# Altium PCB DIO_8SMA_8MCX.PcbDoc (part 4 of 9)
Units mm, origin at the board's own origin, x right, y up, seen from the top; angles counter-clockwise.
Board outline 222.9 x 100 mm, 6 copper layers (TopLayer, L2, L3, L4, L5, Bottom Layer), stack 1.492 mm thick; 542 components, 326 nets, 1968 pads, 1583 vias.
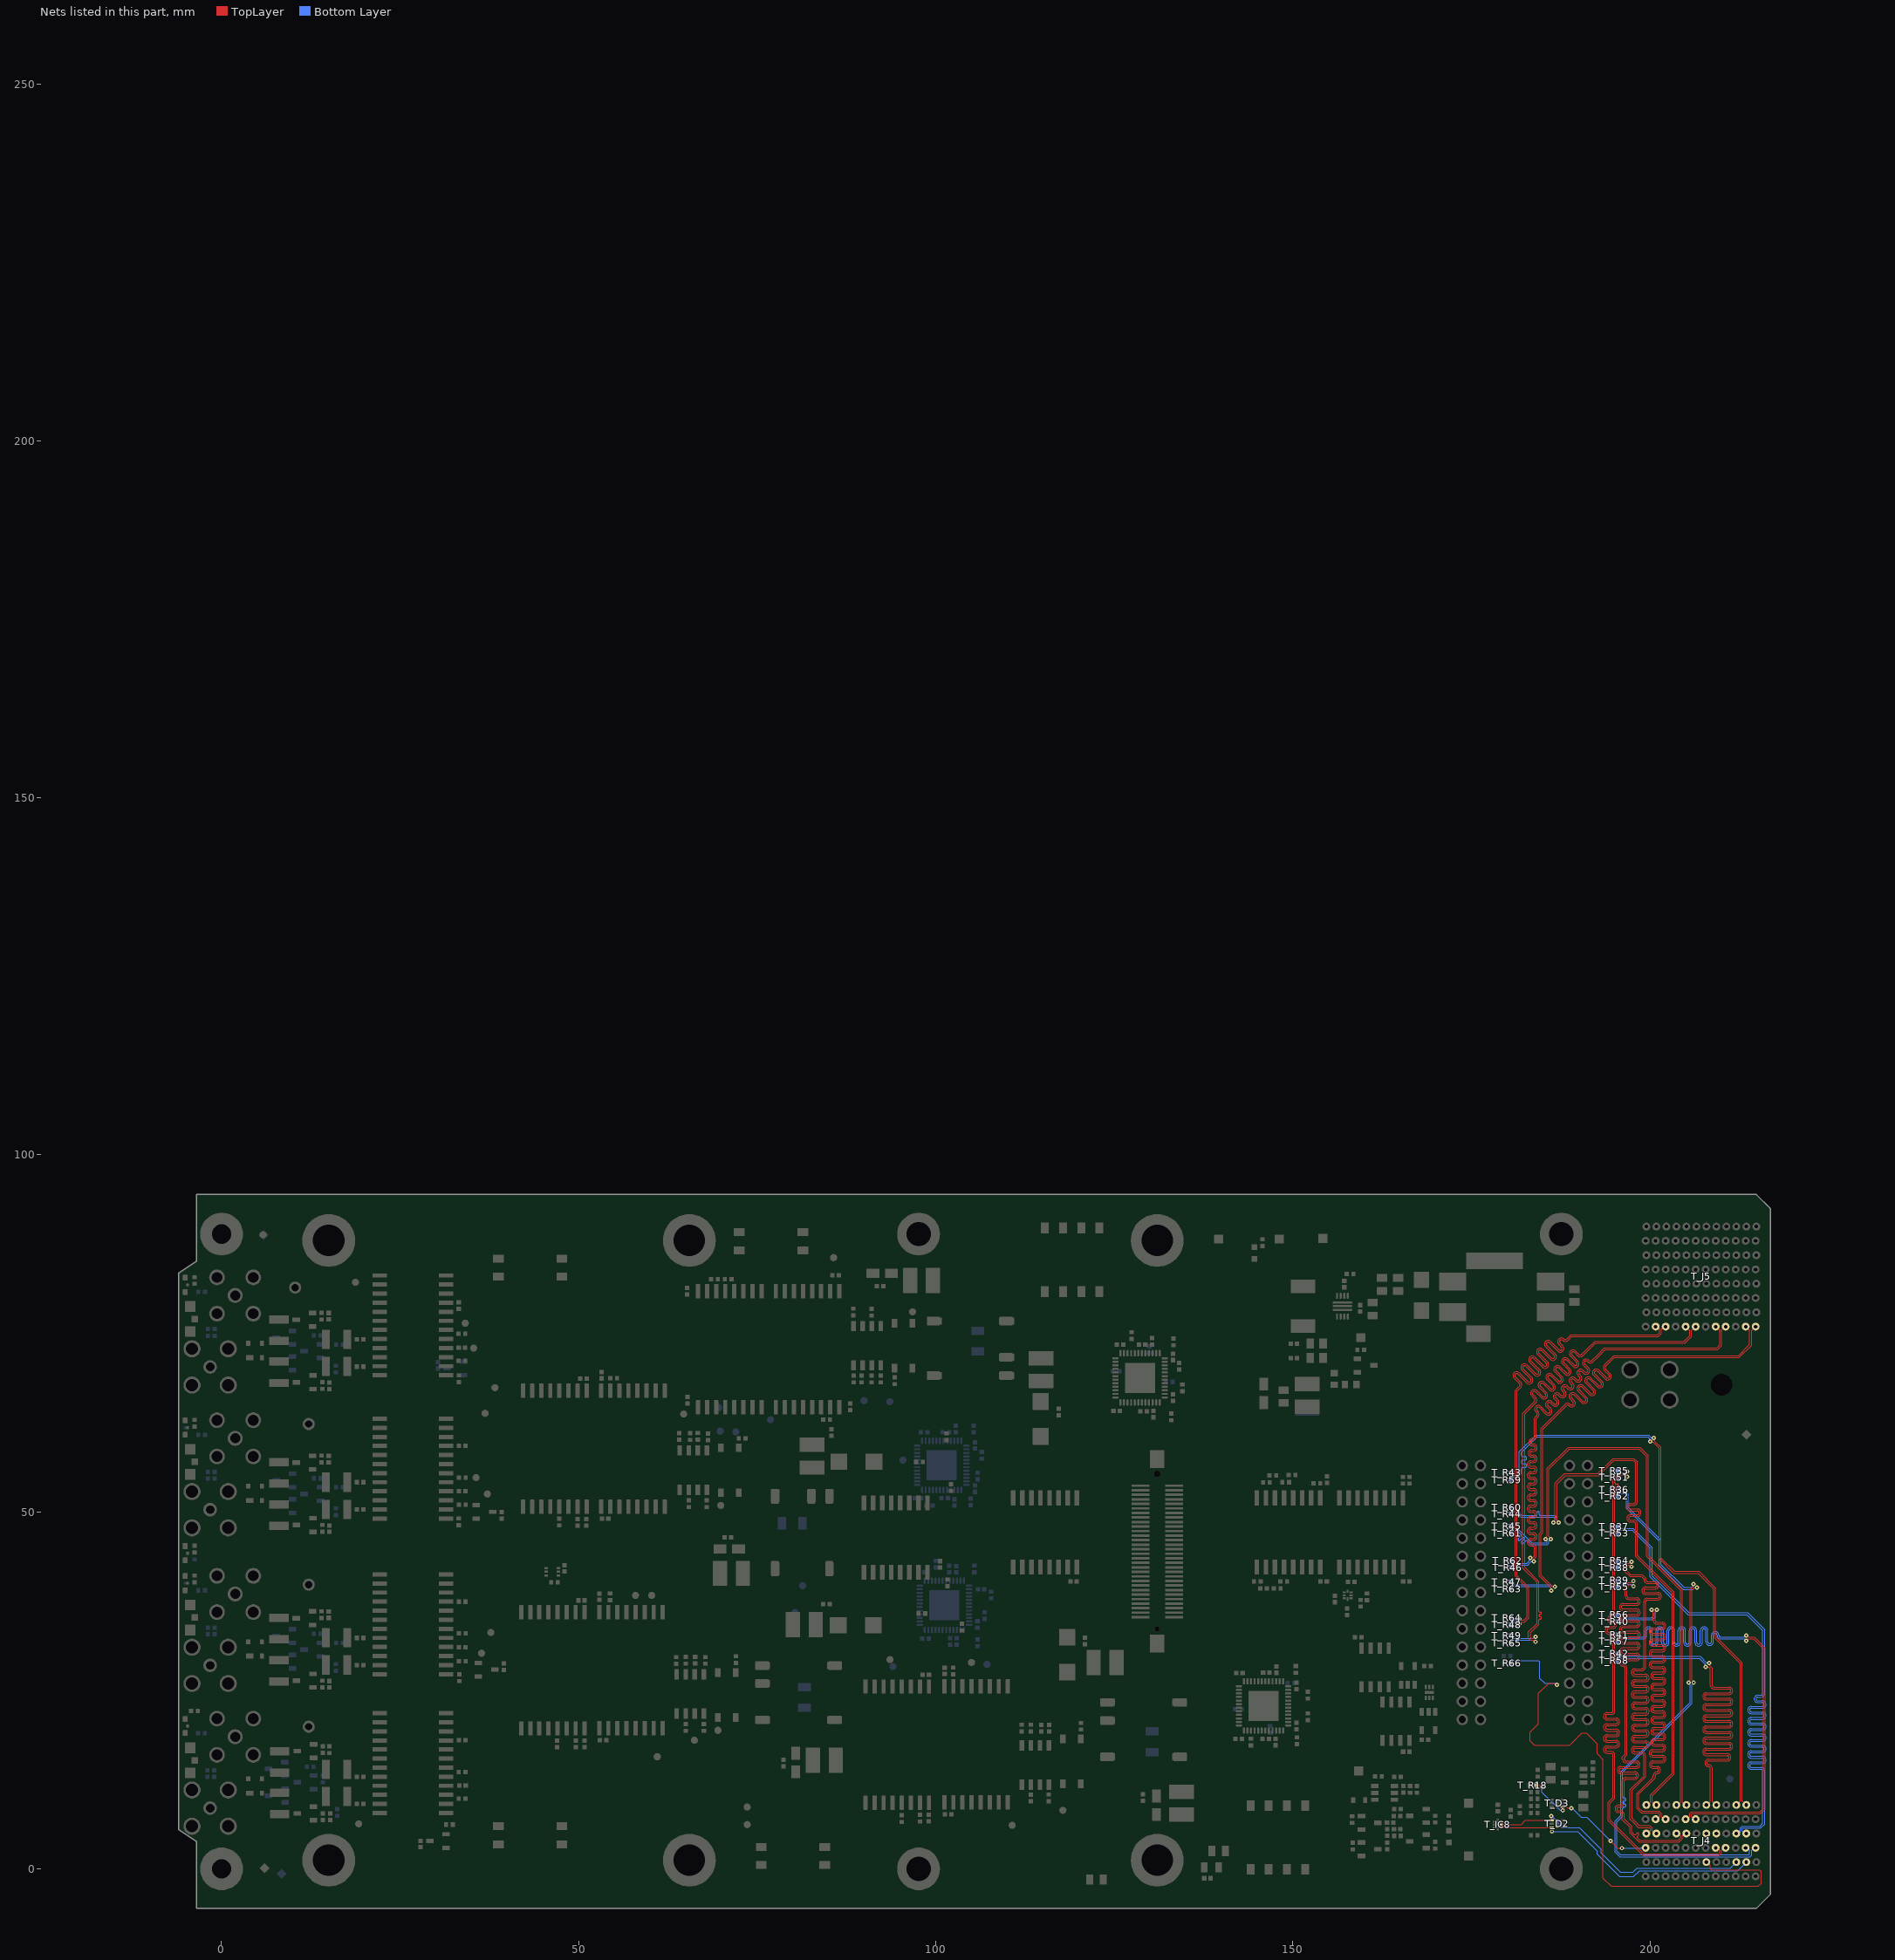
[diagram p7: the nets of this part, all layers, seen from the top]

## Via types
v1: diameter 0.6, hole 0.25, TopLayer to Bottom Layer, tented both sides, 1359 vias
v2: diameter 0.5, hole 0.2, TopLayer to Bottom Layer, tented both sides, 127 vias
v3: diameter 0.6, hole 0.3, TopLayer to Bottom Layer, tented both sides, 45 vias
v4: diameter 0.8, hole 0.3, TopLayer to Bottom Layer, tented both sides, 40 vias
v5: diameter 0.5, hole 0.25, TopLayer to Bottom Layer, tented both sides, 12 vias

## Nets (pads, with @x,y where several pads share a name; then routed paths per layer and width w, separated by ;. In a path a pad name is that pad's centre, name@x,y a point inside that pad or via, vN(x,y) a via of type N, cw(c..) or ccw(c..) an arc to the next point about the centre after c; other vN are vias at no path point) (continued)
BGA3: T_D3.4 T_J4.L3 T_R18.2 | length 20.2
  TopLayer w0.12: T_R18.2@184.07,11.7 184.6,11.7 v1(184.9,11.4) ; T_D3.4@187.76,8.7 T_D3.4@187.763,8.697 ; v1(187.8,8.2) 187.8,8.66 T_D3.4@187.763,8.697 ; v1(189,8.5) 188.452,8.5 188.255,8.697 T_D3.4@187.763,8.697 ; v1(194.475,3.919) 195.49,2.904 v1@196.096,2.904 ; v1@196.081,2.919 v1@196.096,2.904 ; v1(196.1,2.9) v1@196.096,2.904
  Bottom Layer w0.12: v1(184.9,11.4) 184.9,10.721 187.421,8.2 v1(187.8,8.2) ; v1(189,8.5) 189.1,8.5 190.344,7.256 191.138,7.256 v1(194.475,3.919) ; v1(196.1,2.9) 199.353,2.9 T_J4.L3@199.403,2.95
BP_CLK.CLK_N: T_J4.F4
BP_CLK.CLK_P: T_J4.E4
BP_I2C.SCL: T_D2.3 T_IC8.6 T_J4.B2 | length 38.6
  TopLayer w0.15: T_IC8.6@179.175,5.8 182.826,5.8 T_D2.3@186.24,5.8 186.278,5.762 v1(186.278,5.226)
  Bottom Layer w0.15: v1(186.278,5.226) 186.754,5.206 186.878,5.206 189.894,5.206 192.6,2.5 192.6,2.065 195.744,-1.08 197.72,-1.08 198.529,-0.271 212.282,-0.271 T_J4.B2@213.503,0.95
BP_I2C.SDA: T_D2.1 T_IC8.7 T_J4.C2 | length 37.9
  TopLayer w0.15: T_IC8.7@179.175,6.2 181.97,6.2 182.57,6.8 T_D2.1@186.24,6.8 186.24,7.36 v1(186.2,7.4)
  Bottom Layer w0.15: v1(186.2,7.4) 187.8,5.8 190.1,5.8 193.2,2.7 193.2,2.208 195.847,-0.439 197.661,-0.439 198.18,0.08 211.234,0.08 T_J4.C2@212.103,0.95
BP_IO.LVDS_N0: T_J4.E3 T_R51.1 | length 86.3
  TopLayer w0.116: v1(196.8,54.915) 196.72,54.915 196.49,55.144 195.844,55.144 195.529,54.829 195.097,54.397 195.097,54.061 ccw(c195.255,54.061) 195.255,53.903 195.428,53.903 cw(c195.428,53.745) 195.586,53.745 cw(c195.428,53.745) 195.428,53.587 195.255,53.587 ccw(c195.255,53.429) 195.097,53.429 ccw(c195.255,53.429) 195.255,53.271 195.428,53.271 cw(c195.428,53.113) 195.586,53.113 cw(c195.428,53.113) 195.428,52.955 195.255,52.955 ccw(c195.255,52.797) 195.097,52.797 195.097,52.423 195.097,36.402 195.097,35.739 cw(c194.578,35.739) 194.578,35.22 ccw(c194.578,34.962) 194.578,34.704 194.809,34.704 cw(c194.809,34.185) 194.809,33.666 194.251,33.666 ccw(c194.251,33.408) 194.251,33.15 194.578,33.15 cw(c194.578,32.631) 195.097,32.631 195.097,32.442 195.097,22.968 195.097,22.143 cw(c194.578,22.143) 194.578,21.624 194.016,21.624 ccw(c194.016,21.366) 194.016,21.108 195.239,21.108 cw(c195.239,20.589) 195.239,20.07 194.016,20.07 ccw(c194.016,19.812) 194.016,19.554 195.239,19.554 cw(c195.239,19.035) 195.239,18.516 194.016,18.516 ccw(c194.016,18.259) 194.016,18.001 195.239,18.001 cw(c195.239,17.482) 195.239,16.963 194.016,16.963 ccw(c194.016,16.705) 194.016,16.447 194.578,16.447 cw(c194.578,15.928) 195.097,15.928 195.097,15.739 195.097,9.862 194.412,9.176 194.412,6.848 194.821,6.439 195.131,6.128 199.16,2.1 209.57,2.1 209.77,2.3 209.77,2.387 209.769,2.592 209.411,2.95 T_J4.E3@209.2,2.95
  Bottom Layer w0.116: T_R51.1@195.47,54.8 195.702,55.032 195.702,55.077 195.77,55.144 196.17,55.144 196.49,55.144 196.72,54.915 v1(196.8,54.915)
BP_IO.LVDS_N1: T_J4.B3 T_R52.1 | length 83.1
  TopLayer w0.116: v1(206.129,26.1) 206.129,26.18 205.9,26.41 205.9,39.025 206.219,39.343 206.543,39.343 v1(206.6,39.4)
  Bottom Layer w0.116: T_R52.1@195.47,52.2 195.702,52.432 195.702,52.463 195.77,52.531 196.487,52.531 196.7,52.318 196.7,50.5 201.3,45.9 201.3,42.492 204.653,39.139 206.014,39.139 206.219,39.343 206.543,39.343 v1(206.6,39.4) ; v1(206.129,26.1) 206.129,26.02 205.9,25.79 205.9,23.2 196.2,13.5 196.2,10.702 196.2,10.109 ccw(c196.408,10.109) 196.408,9.901 196.437,9.901 cw(c196.437,9.693) 196.645,9.693 cw(c196.437,9.693) 196.437,9.485 196.408,9.485 ccw(c196.408,9.277) 196.2,9.277 ccw(c196.408,9.277) 196.408,9.069 196.437,9.069 cw(c196.437,8.861) 196.645,8.861 cw(c196.437,8.861) 196.437,8.653 196.408,8.653 ccw(c196.408,8.445) 196.2,8.445 196.2,7.971 196.2,7.355 195.4,6.555 195.4,2.453 195.891,1.962 213.902,1.962 213.97,2.03 213.97,2.387 213.969,2.592 213.611,2.95 T_J4.B3@213.4,2.95
BP_IO.LVDS_N2: T_J4.C4 T_R53.1 | length 85.6
  Bottom Layer w0.116: T_R53.1@195.47,47 195.692,47.222 195.692,47.392 195.7,47.4 197.539,47.4 200.039,44.9 200.039,40.892 205.331,35.6 213.6,35.6 215.8,33.4 215.8,25.267 215.8,24.572 cw(c215.542,24.572) 215.542,24.314 215.099,24.314 ccw(c215.099,23.795) 215.099,23.276 215.734,23.276 cw(c215.734,23.018) 215.734,22.76 214.22,22.76 ccw(c214.22,22.241) 214.22,21.722 215.734,21.722 cw(c215.734,21.464) 215.734,21.206 214.22,21.206 ccw(c214.22,20.687) 214.22,20.168 215.734,20.168 cw(c215.734,19.91) 215.734,19.652 214.22,19.652 ccw(c214.22,19.133) 214.22,18.614 215.734,18.614 cw(c215.734,18.356) 215.734,18.098 214.22,18.098 ccw(c214.22,17.579) 214.22,17.06 215.734,17.06 cw(c215.734,16.802) 215.734,16.544 214.22,16.544 ccw(c214.22,16.025) 214.22,15.506 215.734,15.506 cw(c215.734,15.248) 215.734,14.99 214.22,14.99 ccw(c214.22,14.471) 214.22,13.952 215.542,13.952 cw(c215.542,13.694) 215.8,13.694 215.8,13.505 215.8,6.369 215.392,5.961 212.89,5.961 212.67,5.74 212.67,5.512 212.669,5.308 212.311,4.95 T_J4.C4@212.1,4.95
BP_IO.LVDS_N3: T_J4.L4 T_R54.1 | length 82.7
  TopLayer w0.116: v1(197.432,43.022) 197.351,43.022 197.122,42.793 196.86,42.793 196.439,42.372 196.439,41.692 197.187,40.944 198.795,40.944 199.041,40.698 199.139,40.6 199.139,40.509 ccw(c199.658,40.509) 199.658,39.99 200.738,39.99 cw(c200.738,39.732) 200.996,39.732 cw(c200.738,39.732) 200.738,39.474 199.397,39.474 ccw(c199.397,38.955) 198.878,38.955 ccw(c199.397,38.955) 199.397,38.436 201.103,38.436 cw(c201.103,38.178) 201.361,38.178 cw(c201.103,38.178) 201.103,37.92 199.658,37.92 ccw(c199.658,37.401) 199.139,37.401 199.139,36.562 199.139,36.319 199.139,28.908 199.139,28.289 cw(c198.881,28.289) 198.881,28.031 197.919,28.031 ccw(c197.919,27.512) 197.919,26.993 199.364,26.993 cw(c199.364,26.735) 199.364,26.477 197.919,26.477 ccw(c197.919,25.958) 197.919,25.439 199.364,25.439 cw(c199.364,25.181) 199.364,24.923 197.919,24.923 ccw(c197.919,24.404) 197.919,23.885 199.364,23.885 cw(c199.364,23.627) 199.364,23.369 197.919,23.369 ccw(c197.919,22.85) 197.919,22.331 199.364,22.331 cw(c199.364,22.073) 199.364,21.815 197.919,21.815 ccw(c197.919,21.296) 197.919,20.777 199.364,20.777 cw(c199.364,20.519) 199.364,20.261 197.919,20.261 ccw(c197.919,19.742) 197.919,19.223 199.364,19.223 cw(c199.364,18.965) 199.364,18.707 197.919,18.707 ccw(c197.919,18.188) 197.919,17.669 199.364,17.669 cw(c199.364,17.411) 199.364,17.153 197.919,17.153 ccw(c197.919,16.634) 197.919,16.115 198.881,16.115 cw(c198.881,15.857) 199.139,15.857 199.139,15.669 199.139,13.008 197.239,11.108 197.239,6.96 197.61,6.588 197.61,6.581 198.392,5.8 199.869,5.8 200.07,5.6 200.07,5.512 200.069,5.308 199.711,4.95 T_J4.L4@199.5,4.95
  Bottom Layer w0.116: T_R54.1@195.47,43.125 195.702,42.893 195.702,42.861 195.77,42.793 197.122,42.793 197.351,43.022 v1(197.432,43.022)
BP_IO.LVDS_N4: T_J4.I4 T_R55.1 | length 85.3
  TopLayer w0.116: v1(197.7,39.6) 197.569,39.6 197.35,39.819 197.1,39.819 196.8,39.519 196.8,38.408 196.8,38.22 ccw(c197.058,38.22) 197.058,37.962 198.133,37.962 cw(c198.133,37.443) 198.133,36.924 196.26,36.924 ccw(c196.26,36.666) 196.26,36.408 198.133,36.408 cw(c198.133,35.889) 198.133,35.37 196.26,35.37 ccw(c196.26,35.112) 196.26,34.854 198.133,34.854 cw(c198.133,34.335) 198.133,33.816 196.26,33.816 ccw(c196.26,33.558) 196.26,33.3 198.133,33.3 cw(c198.133,32.781) 198.133,32.262 196.26,32.262 ccw(c196.26,32.004) 196.26,31.746 198.133,31.746 cw(c198.133,31.227) 198.133,30.708 196.26,30.708 ccw(c196.26,30.45) 196.26,30.192 198.133,30.192 cw(c198.133,29.673) 198.133,29.154 196.26,29.154 ccw(c196.26,28.896) 196.26,28.638 196.281,28.638 cw(c196.281,28.119) 196.8,28.119 196.8,27.502 196.8,17.13 196.8,15.953 196.4,15.553 196.4,15.387 ccw(c196.658,15.387) 196.658,15.129 198.097,15.129 cw(c198.097,14.61) 198.097,14.091 195.941,14.091 ccw(c195.941,13.833) 195.941,13.575 197.892,13.575 cw(c197.892,13.056) 197.892,12.537 196.658,12.537 ccw(c196.658,12.279) 196.4,12.279 196.4,11.386 196.4,10.002 196.4,9.184 cw(c195.881,9.184) 195.881,8.665 195.625,8.665 ccw(c195.625,8.407) 195.625,8.149 195.881,8.149 cw(c195.881,7.63) 196.4,7.63 196.4,7.442 196.4,7 197.449,5.951 197.449,5.151 197.49,5.11 197.789,4.811 ccw(c197.9,4.923) 198.012,4.811 198.187,4.986 cw(c198.299,4.875) 198.411,4.986 cw(c198.299,4.875) 198.411,4.763 198.236,4.588 ccw(c198.347,4.476) 198.236,4.364 198.459,4.141 198.5,4.1 198.6,4 203.97,4 204.27,4.3 204.27,4.387 204.269,4.592 203.911,4.95 T_J4.I4@203.7,4.95
  Bottom Layer w0.116: T_R55.1@195.47,39.5 195.47,39.52 195.769,39.819 196.273,39.819 196.283,39.829 197.39,39.829 197.62,39.6 v1(197.7,39.6)
BP_IO.LVDS_N5: T_J4.K5 T_R56.1 | length 82.6
  TopLayer w0.116: v1(200.239,36.3) 200.445,36.026 cw(c200.353,35.956) 200.469,35.956 200.468,35.001 200.468,34.813 ccw(c200.987,34.813) 200.987,34.294 201.708,34.294 cw(c201.708,34.036) 201.708,33.778 200.409,33.778 ccw(c200.409,33.259) 200.409,32.74 201.708,32.74 cw(c201.708,32.482) 201.708,32.224 200.409,32.224 ccw(c200.409,31.705) 200.409,31.186 201.708,31.186 cw(c201.708,30.928) 201.708,30.67 200.409,30.67 ccw(c200.409,30.151) 200.409,29.632 201.708,29.632 cw(c201.708,29.374) 201.708,29.116 200.409,29.116 ccw(c200.409,28.597) 200.409,28.078 201.708,28.078 cw(c201.708,27.82) 201.708,27.562 200.638,27.562 ccw(c200.638,27.043) 200.638,26.524 201.708,26.524 cw(c201.708,26.266) 201.708,26.008 200.638,26.008 ccw(c200.638,25.489) 200.638,24.97 201.708,24.97 cw(c201.708,24.712) 201.708,24.454 200.638,24.454 ccw(c200.638,23.935) 200.638,23.416 201.708,23.416 cw(c201.708,23.158) 201.708,22.9 200.638,22.9 ccw(c200.638,22.381) 200.638,21.862 201.708,21.862 cw(c201.708,21.604) 201.708,21.346 200.638,21.346 ccw(c200.638,20.827) 200.638,20.308 201.708,20.308 cw(c201.708,20.05) 201.708,19.792 200.638,19.792 ccw(c200.638,19.273) 200.638,18.754 201.708,18.754 cw(c201.708,18.496) 201.708,18.238 200.638,18.238 ccw(c200.638,17.719) 200.638,17.2 201.708,17.2 cw(c201.708,16.942) 201.708,16.684 200.409,16.684 ccw(c200.409,16.165) 200.409,15.646 201.708,15.646 cw(c201.708,15.388) 201.708,15.13 200.45,15.13 ccw(c200.45,14.611) 200.45,14.092 200.988,14.092 cw(c200.988,13.834) 200.988,13.576 ccw(c200.987,13.057) 200.468,13.057 200.468,12.838 200.296,12.666 200.054,12.423 198.194,10.563 198.194,8.437 198.811,7.82 201.149,7.82 201.37,7.6 201.37,7.512 201.369,7.308 201.011,6.95 T_J4.K5@200.8,6.95
  Bottom Layer w0.116: T_R56.1@195.47,35.55 195.47,35.53 195.702,35.298 195.722,35.298 195.858,35.162 200.262,35.162 200.5,35.4 200.5,35.72 200.469,35.751 200.469,35.99 200.239,36.22 v1(200.239,36.3)
BP_IO.LVDS_N6: T_J4.H5 T_R57.1 | length 81.5
  TopLayer w0.116: T_J4.H5@205.003,6.95 205.214,6.95 205.573,7.308 205.573,7.512 205.573,7.74 205.793,7.961 215.392,7.961 215.896,8.466 215.896,30.804 214.506,32.195 213.81,32.195 213.58,31.965 v1(213.5,31.965)
  Bottom Layer w0.116: T_R57.1@195.47,31.75 195.685,31.965 195.685,32.127 195.753,32.194 196.379,32.194 198.849,32.195 199.037,32.195 ccw(c199.037,32.713) 199.556,32.713 199.556,33.375 cw(c199.814,33.375) 200.072,33.375 200.072,31.713 ccw(c200.591,31.713) 201.11,31.713 201.11,33.375 cw(c201.368,33.375) 201.626,33.375 201.626,31.713 ccw(c202.145,31.713) 202.664,31.713 202.664,33.375 cw(c202.922,33.375) 203.18,33.375 203.18,31.713 ccw(c203.699,31.713) 204.218,31.713 204.218,33.375 cw(c204.476,33.375) 204.734,33.375 204.734,31.713 ccw(c205.253,31.713) 205.772,31.713 205.772,33.375 cw(c206.03,33.375) 206.288,33.375 206.288,31.713 ccw(c206.807,31.713) 207.326,31.713 207.326,33.375 cw(c207.584,33.375) 207.842,33.375 207.842,31.803 ccw(c208.361,31.803) 208.88,31.803 208.88,32.714 cw(c209.138,32.714) 209.396,32.714 ccw(c209.915,32.713) 209.915,32.195 211.71,32.195 213.19,32.195 213.42,31.965 v1(213.5,31.965)
BP_IO.LVDS_N7: T_J4.F6 T_R58.1 | length 82.6
  TopLayer w0.116: v1(207.8,28.3) 207.857,28.243 208.181,28.243 208.47,27.955 208.47,25.9 208.469,25.711 ccw(c208.988,25.711) 208.988,25.192 211.091,25.192 cw(c211.091,24.934) 211.091,24.676 207.913,24.676 ccw(c207.913,24.157) 207.913,23.638 211.091,23.638 cw(c211.091,23.38) 211.091,23.123 207.913,23.123 ccw(c207.913,22.604) 207.913,22.085 211.091,22.085 cw(c211.091,21.827) 211.091,21.569 207.913,21.569 ccw(c207.913,21.05) 207.913,20.531 211.091,20.531 cw(c211.091,20.273) 211.091,20.015 207.913,20.015 ccw(c207.913,19.496) 207.913,18.977 211.091,18.977 cw(c211.091,18.719) 211.091,18.461 207.913,18.461 ccw(c207.913,17.942) 207.913,17.423 211.091,17.423 cw(c211.091,17.165) 211.091,16.907 207.913,16.907 ccw(c207.913,16.388) 207.913,15.869 210.824,15.869 cw(c210.824,15.611) 210.824,15.353 208.211,15.353 ccw(c208.211,14.834) 208.211,14.315 cw(c208.212,14.057) 208.469,14.057 208.469,13.215 208.469,9.448 207.971,8.95 T_J4.F6@207.9,8.95
  Bottom Layer w0.116: T_R58.1@195.47,29.1 195.47,29.183 195.707,29.42 195.767,29.42 195.837,29.49 206.935,29.49 207.743,28.681 207.743,28.357 v1(207.8,28.3)
BP_IO.LVDS_N8: T_J4.C6 T_R59.1 | length 84.9
  TopLayer w0.116: v1(200.038,59.838) 200.095,59.781 200.419,59.781 200.573,59.627 201.3,58.9 201.3,43.431 203.331,41.4 206.731,41.4 208.939,39.192 208.939,32.461 212.673,28.727 212.673,9.519 T_J4.C6@212.103,8.95
  Bottom Layer w0.116: T_R59.1@180.47,54.476 180.702,54.708 180.702,54.778 180.77,54.845 181.445,54.845 181.974,55.374 181.976,55.376 181.976,55.948 cw(c182.234,55.948) 182.234,56.206 182.465,56.206 ccw(c182.465,56.464) 182.723,56.464 ccw(c182.465,56.464) 182.465,56.722 182.234,56.722 cw(c182.234,56.98) 181.976,56.98 cw(c182.234,56.98) 182.234,57.238 182.465,57.238 ccw(c182.465,57.496) 182.723,57.496 ccw(c182.465,57.496) 182.465,57.754 182.234,57.754 cw(c182.234,58.012) 181.976,58.012 181.976,58.307 182.243,58.574 184.169,60.5 199.7,60.5 199.981,60.219 199.981,59.895 v1(200.038,59.838)
BP_IO.LVDS_N9: T_J4.L6 T_R60.1 | length 83.1
  TopLayer w0.116: v1(187.22,48.5) 187.22,48.631 186.993,48.858 186.993,49.158 ccw(c186.616,49.157) 186.986,49.225 cw(c187.456,49.313) 186.986,49.402 ccw(c186.616,49.469) 186.993,49.468 186.993,53.893 188.182,55.082 192.814,55.082 194.947,57.214 197.68,57.214 198,56.894 198,52.4 198,51.434 cw(c197.742,51.434) 197.742,51.176 197.277,51.176 ccw(c197.277,50.657) 197.277,50.138 198.242,50.138 cw(c198.242,49.88) 198.242,49.623 197.277,49.623 ccw(c197.277,49.104) 197.277,48.585 197.742,48.585 cw(c197.742,48.327) 198,48.327 198,47.365 198,43.765 203.139,38.626 203.139,13.408 200.07,10.339 200.07,9.512 200.069,9.308 199.711,8.95 T_J4.L6@199.5,8.95
  Bottom Layer w0.116: T_R60.1@180.47,50.6 180.47,50.58 180.702,50.348 180.745,50.348 180.77,50.323 181.246,50.323 182.069,49.5 183.349,49.5 184.053,49.5 ccw(c184.053,49.658) 184.211,49.658 184.211,49.89 cw(c184.369,49.89) 184.369,50.048 cw(c184.369,49.89) 184.527,49.89 184.527,49.658 ccw(c184.685,49.658) 184.685,49.5 185.059,49.5 186.696,49.5 186.967,49.229 186.967,48.833 187.22,48.58 v1(187.22,48.5)
BP_IO.LVDS_N10: T_J4.I6 T_R61.1 | length 86.1
  TopLayer w0.116: v1(186.1,46.2) 186.1,46.28 185.871,46.51 185.871,55.971 188.7,58.8 198.5,58.8 199.539,57.761 199.539,43.761 204.27,39.031 204.27,9.512 204.269,9.308 203.911,8.95 T_J4.I6@203.7,8.95
  Bottom Layer w0.116: T_R61.1@180.47,46.976 180.47,46.996 180.702,47.228 180.722,47.228 180.818,47.324 181.431,47.324 181.668,47.088 181.709,47.047 181.932,46.824 cw(c181.82,46.712) 181.932,46.6 181.572,46.24 ccw(c181.684,46.129) 181.572,46.017 ccw(c181.684,46.129) 181.795,46.017 182.155,46.377 cw(c182.267,46.265) 182.379,46.377 cw(c182.267,46.265) 182.379,46.153 182.019,45.793 ccw(c182.131,45.682) 182.019,45.57 ccw(c182.131,45.682) 182.242,45.57 182.602,45.93 cw(c182.714,45.818) 182.826,45.93 183.072,45.684 183.113,45.643 183.347,45.409 185.65,45.409 185.871,45.629 185.871,45.89 186.1,46.12 v1(186.1,46.2)
BP_IO.LVDS_N11: T_J5.E1 T_R62.1 | length 83.2
  TopLayer w0.116: v1(183.254,43.567) 183.31,43.623 183.635,43.623 183.816,43.805 183.816,44.8 183.816,44.989 ccw(c183.558,44.989) 183.558,45.247 183.335,45.247 cw(c183.335,45.766) 183.335,46.285 183.678,46.285 ccw(c183.678,46.543) 183.678,46.801 183.335,46.801 cw(c183.335,47.319) 183.335,47.838 183.678,47.838 ccw(c183.678,48.096) 183.678,48.354 183.335,48.354 cw(c183.335,48.873) 183.335,49.392 183.678,49.392 ccw(c183.678,49.65) 183.678,49.908 183.335,49.908 cw(c183.335,50.427) 183.335,50.946 183.678,50.946 ccw(c183.678,51.204) 183.678,51.462 183.335,51.462 cw(c183.335,51.981) 183.335,52.5 183.678,52.5 ccw(c183.678,52.758) 183.678,53.016 183.335,53.016 cw(c183.335,53.535) 183.335,54.054 183.678,54.054 ccw(c183.678,54.312) 183.678,54.57 183.335,54.57 cw(c183.335,55.089) 183.335,55.608 183.678,55.608 ccw(c183.678,55.866) 183.678,56.124 183.335,56.124 cw(c183.335,56.643) 183.335,57.162 183.678,57.162 ccw(c183.678,57.42) 183.678,57.678 183.469,57.678 cw(c183.469,58.197) 183.469,58.716 183.678,58.716 ccw(c183.678,58.974) 183.678,59.232 183.558,59.232 cw(c183.558,59.751) 183.558,60.27 ccw(c183.558,60.528) 183.816,60.528 183.816,61.226 183.816,63.149 184.029,63.361 184.162,63.495 ccw(c183.98,63.677) 184.162,63.859 184.005,64.016 cw(c184.371,64.384) 184.004,64.751 cw(c184.371,64.384) 184.696,64.789 184.7,64.789 185.604,63.885 ccw(c185.786,64.069) 185.968,63.886 ccw(c185.786,64.069) 185.967,64.252 185.533,64.686 ; 185.533,64.687 cw(c185.899,65.054) 185.532,65.421 cw(c185.899,65.054) 186.223,65.459 186.228,65.459 186.564,65.123 ccw(c186.746,65.306) 186.928,65.124 ccw(c186.746,65.306) 186.928,65.489 186.632,65.785 cw(c186.998,66.153) 186.631,66.52 cw(c186.998,66.153) 187.322,66.558 187.327,66.558 187.572,66.313 ccw(c187.753,66.496) 187.936,66.314 ccw(c187.753,66.496) 187.935,66.679 187.73,66.884 cw(c188.097,67.252) 187.73,67.619 cw(c188.097,67.252) 188.421,67.657 188.425,67.657 188.672,67.411 ccw(c188.853,67.594) 189.036,67.411 ccw(c188.853,67.594) 189.035,67.777 ; 189.035,67.777 188.829,67.983 cw(c189.196,68.35) 188.829,68.717 cw(c189.196,68.35) 189.52,68.756 189.524,68.756 189.773,68.507 ccw(c189.955,68.69) 190.137,68.508 ccw(c189.955,68.69) 190.137,68.873 189.928,69.082 ; 189.928,69.082 cw(c190.294,69.449) 189.927,69.816 cw(c190.294,69.449) 190.619,69.855 190.623,69.855 190.875,69.603 ccw(c191.057,69.786) 191.239,69.603 ccw(c191.057,69.786) 191.239,69.969 ; 190.698,70.509 191.239,69.969 ; 190.698,70.509 cw(c191.065,70.877) 190.698,71.244 cw(c191.065,70.877) 191.389,71.282 191.393,71.282 191.489,71.186 ccw(c191.671,71.369) 191.854,71.186 192.541,71.874 193.628,72.961 209.361,72.961 209.8,73.4 209.8,75.234 209.773,75.261 209.773,75.465 209.288,75.95 T_J5.E1@209.203,75.95
  Bottom Layer w0.116: T_R62.1@180.57,43.15 180.802,42.918 180.802,42.873 180.87,42.805 182.792,42.805 183.184,43.198 183.184,43.497 v1(183.254,43.567)
BP_IO.LVDS_N12: T_J5.B1 T_R63.1 | length 82.8
  TopLayer w0.116: v1(186.191,38.991) 186.134,39.048 186.134,39.372 184.478,41.028 184.478,46.947 184.732,47.201 184.732,61.664 186.887,63.819 188.117,65.049 cw(c188.484,64.682) 188.851,65.049 ; 188.851,65.049 ccw(c189.033,65.232) 189.216,65.049 ccw(c189.033,65.232) 189.216,65.414 188.829,65.8 cw(c189.196,66.167) 188.829,66.534 cw(c189.196,66.167) 189.563,66.534 190.565,65.532 190.592,65.506 ccw(c190.773,65.689) 190.956,65.507 ccw(c190.774,65.689) 190.955,65.872 ; 190.955,65.872 189.921,66.907 cw(c190.287,67.274) 189.92,67.641 cw(c190.287,67.274) 190.611,67.68 190.616,67.68 191.691,66.605 ccw(c191.872,66.788) 192.055,66.605 ccw(c191.872,66.788) 192.054,66.971 191.023,68.002 cw(c191.389,68.37) 191.022,68.737 cw(c191.389,68.37) 191.713,68.775 191.718,68.775 192.79,67.704 ccw(c192.971,67.887) 193.154,67.704 ccw(c192.971,67.887) 193.153,68.07 192.113,69.109 ; 192.113,69.11 cw(c192.48,69.477) 192.113,69.844 cw(c192.48,69.477) 192.804,69.882 192.808,69.882 193.888,68.802 ccw(c194.07,68.986) 194.252,68.803 ccw(c194.07,68.986) 194.252,69.168 193.612,69.809 cw(c193.978,70.176) 193.611,70.543 193.744,70.677 194.929,71.861 212.392,71.861 213.973,73.442 213.973,75.38 T_J5.B1@213.403,75.95
  Bottom Layer w0.116: T_R63.1@180.47,39.176 180.702,39.408 180.702,39.478 180.77,39.545 185.961,39.545 186.134,39.372 186.134,39.048 v1(186.191,38.991)
BP_IO.LVDS_N13: T_J5.K1 T_R64.1 | length 82.4
  TopLayer w0.116: v1(181.7,35.02) 181.806,35.02 182.01,34.816 182.347,34.816 182.8,35.269 182.8,39.331 181.133,40.998 181.133,67.002 181.6,67.469 181.733,67.602 ccw(c181.551,67.785) 181.733,67.967 180.977,68.724 cw(c181.343,69.092) 180.976,69.459 cw(c181.343,69.092) 181.667,69.497 181.672,69.497 182.92,68.248 ccw(c183.102,68.431) 183.284,68.249 ccw(c183.102,68.431) 183.284,68.614 ; 183.174,70.922 cw(c183.541,71.289) 183.174,71.656 cw(c183.541,71.289) 183.865,71.694 183.869,71.694 185.118,70.446 ccw(c185.3,70.629) 185.482,70.447 ccw(c185.3,70.629) 185.482,70.812 184.273,72.02 ; 183.174,70.922 184.382,69.713 cw(c184.201,69.53) 184.383,69.348 cw(c184.201,69.53) 184.019,69.347 182.771,70.596 182.766,70.596 ccw(c182.442,70.19) 182.075,70.557 ccw(c182.442,70.19) 182.075,69.823 183.284,68.615 ; 184.273,72.021 cw(c184.639,72.388) 184.272,72.755 cw(c184.639,72.388) 184.964,72.793 184.968,72.793 186.217,71.545 ccw(c186.398,71.728) 186.581,71.546 ccw(c186.398,71.728) 186.58,71.911 ; 186.58,71.911 185.372,73.119 cw(c185.738,73.487) 185.371,73.854 cw(c185.738,73.487) 186.063,73.892 186.067,73.892 186.134,73.825 187.27,72.689 ccw(c187.452,72.872) 187.635,72.689 ccw(c187.452,72.872) 187.635,73.054 187.227,73.461 cw(c187.594,73.828) 187.227,74.195 cw(c187.594,73.828) 187.961,74.195 ccw(c188.144,74.378) 188.326,74.195 188.886,74.755 188.931,74.8 201.073,74.8 201.373,75.1 201.373,75.387 201.373,75.592 201.014,75.95 T_J5.K1@200.803,75.95
  Bottom Layer w0.116: T_R64.1@180.47,35.176 180.702,34.944 180.702,34.874 180.77,34.806 181.297,34.806 181.417,34.927 181.607,34.927 v1(181.7,35.02)
BP_IO.LVDS_N14: T_J5.H1 T_R65.1 | length 86
  TopLayer w0.116: v1(184,31.791) 183.92,31.791 183.69,32.02 183.282,32.02 182.996,32.306 182.996,33.169 184.2,34.373 184.2,40.131 182.2,42.131 182.2,63.8 182.438,64.038 183.851,65.451 ccw(c183.668,65.633) 183.851,65.816 183.442,66.224 cw(c183.809,66.591) 183.442,66.958 cw(c183.809,66.591) 184.176,66.958 184.958,66.177 184.979,66.156 ccw(c185.16,66.339) 185.343,66.156 ccw(c185.16,66.339) 185.342,66.522 184.479,67.385 cw(c184.845,67.753) 184.478,68.12 cw(c184.845,67.753) 185.169,68.158 185.174,68.158 186.078,67.254 ccw(c186.259,67.438) 186.442,67.255 ccw(c186.259,67.438) 186.441,67.621 185.578,68.484 cw(c185.944,68.852) 185.577,69.219 cw(c185.944,68.852) 186.268,69.257 186.273,69.257 187.176,68.353 ccw(c187.358,68.537) 187.54,68.354 ccw(c187.358,68.537) 187.54,68.719 186.676,69.583 cw(c187.043,69.951) 186.676,70.318 cw(c187.043,69.951) 187.367,70.356 187.371,70.356 188.275,69.452 ccw(c188.457,69.635) 188.639,69.453 ccw(c188.457,69.635) 188.639,69.818 ; 187.775,70.682 188.639,69.818 ; 187.775,70.682 cw(c188.141,71.05) 187.775,71.417 cw(c188.141,71.05) 188.466,71.455 188.47,71.455 189.374,70.551 ccw(c189.556,70.734) 189.738,70.552 ccw(c189.556,70.734) 189.738,70.917 ; 188.874,71.781 cw(c189.24,72.148) 188.873,72.515 cw(c189.24,72.148) 189.565,72.554 189.569,72.554 190.079,72.043 ccw(c190.261,72.226) 190.444,72.044 191.127,72.727 192.3,73.9 204.8,73.9 205.573,74.673 205.573,75.38 T_J5.H1@205.003,75.95 ; 188.874,71.781 189.737,70.917
  Bottom Layer w0.116: T_R65.1@180.47,31.626 180.702,31.858 180.702,31.953 180.77,32.02 181.379,32.02 183.69,32.02 183.92,31.791 v1(184,31.791)
BP_IO.LVDS_N15: T_J4.F2 T_R66.2 | length 82.9
  TopLayer w0.116: v1(187,25.8) 186.89,25.8 186.69,26 185.834,26 184.4,24.566 184.4,20.329 183.951,19.88 183.236,19.165 183.236,17.898 183.814,17.32 188.68,17.32 188.685,17.315 188.781,17.315 189.964,18.498 189.964,18.51 190.17,18.716 190.182,18.716 190.475,19.009 191.091,19.009 192.603,17.497 192.603,16.161 193.436,15.328 193.436,-1.303 194.568,-2.435 215.195,-2.435 215.58,-2.05 215.58,-0.35 215.366,-0.136 208.56,-0.136 208.422,0.002 208.422,0.428 T_J4.F2@207.9,0.95
  Bottom Layer w0.116: T_R66.2@180.47,28.8 180.47,28.82 180.702,29.052 180.722,29.052 180.85,29.18 181.517,29.18 182.853,29.18 184.388,29.18 184.564,29.003 184.564,26.688 185.27,25.982 186.69,25.982 186.872,25.8 v1(187,25.8)
BP_IO.LVDS_P0: T_J4.D3 T_R35.1 | length 86.2
  TopLayer w0.116: 194.636,6.254 194.87,6.02 199.052,1.839 209.678,1.839 210.031,2.192 210.031,2.496 210.03,2.592 210.389,2.95 T_J4.D3@210.6,2.95 ; 194.638,6.253 194.151,6.74 194.151,9.284 194.836,9.97 194.836,15.739 194.836,15.928 ccw(c194.578,15.928) 194.578,16.186 194.016,16.186 cw(c194.016,16.705) 194.016,17.224 195.239,17.224 ccw(c195.239,17.482) 195.239,17.74 194.016,17.74 cw(c194.016,18.259) 194.016,18.777 195.239,18.777 ccw(c195.239,19.035) 195.239,19.293 194.016,19.293 cw(c194.016,19.812) 194.016,20.331 195.239,20.331 ccw(c195.239,20.589) 195.239,20.847 194.016,20.847 cw(c194.016,21.366) 194.016,21.885 194.578,21.885 ccw(c194.578,22.143) 194.836,22.143 194.836,22.968 194.836,32.442 194.836,32.631 ccw(c194.578,32.631) 194.578,32.889 194.251,32.889 cw(c194.251,33.408) 194.251,33.927 194.809,33.927 ccw(c194.809,34.185) 194.809,34.443 194.578,34.443 cw(c194.578,34.962) 194.578,35.481 ccw(c194.578,35.739) 194.836,35.739 194.836,36.402 194.836,54.506 195.736,55.405 196.49,55.405 196.72,55.635 v1(196.8,55.635)
  Bottom Layer w0.116: T_R35.1@195.47,55.75 195.702,55.518 195.702,55.473 195.77,55.405 196.062,55.405 196.49,55.405 196.72,55.635 v1(196.8,55.635)
BP_IO.LVDS_P1: T_J4.A3 T_R36.1 | length 82.9
  TopLayer w0.116: v1(205.41,26.1) 205.41,26.18 205.639,26.41 205.639,39.133 206.034,39.528 206.034,39.852 v1(206.091,39.909)
  Bottom Layer w0.116: T_R36.1@195.467,53.121 195.699,52.889 195.699,52.86 195.767,52.792 196.595,52.792 196.961,52.426 196.961,52.174 196.961,50.608 197.233,50.336 201.561,46.008 201.561,42.6 204.761,39.4 205.906,39.4 206.034,39.528 206.034,39.852 v1(206.091,39.909) ; v1(205.41,26.1) 205.41,26.02 205.639,25.79 205.639,23.308 195.939,13.608 195.939,7.463 195.139,6.663 195.139,2.344 195.783,1.701 214.01,1.701 214.231,1.922 214.231,2.496 214.23,2.592 214.589,2.95 T_J4.A3@214.8,2.95
BP_IO.LVDS_P2: T_J4.B4 T_R37.1 | length 85.9
  Bottom Layer w0.116: T_R37.1@195.47,47.9 195.47,47.891 195.7,47.661 197.647,47.661 200.3,45.008 200.3,41 205.439,35.861 213.708,35.861 216.061,33.508 216.061,25.267 216.061,24.572 cw(c215.542,24.572) 215.542,24.053 215.099,24.053 ccw(c215.099,23.795) 215.099,23.537 215.734,23.537 cw(c215.734,23.018) 215.734,22.499 214.22,22.499 ccw(c214.22,22.241) 214.22,21.983 215.734,21.983 cw(c215.734,21.464) 215.734,20.945 214.22,20.945 ccw(c214.22,20.687) 214.22,20.429 215.734,20.429 cw(c215.734,19.91) 215.734,19.391 214.22,19.391 ccw(c214.22,19.133) 214.22,18.875 215.734,18.875 cw(c215.734,18.356) 215.734,17.837 214.22,17.837 ccw(c214.22,17.579) 214.22,17.321 215.734,17.321 cw(c215.734,16.802) 215.734,16.283 214.22,16.283 ccw(c214.22,16.025) 214.22,15.767 215.734,15.767 cw(c215.734,15.248) 215.734,14.729 214.22,14.729 ccw(c214.22,14.471) 214.22,14.213 215.542,14.213 cw(c215.542,13.694) 216.061,13.694 216.061,13.505 216.061,6.261 215.5,5.7 212.998,5.7 212.931,5.632 212.931,5.404 212.93,5.308 213.289,4.95 T_J4.B4@213.5,4.95
BP_IO.LVDS_P3: T_J4.K4 T_R38.1 | length 82.3
  TopLayer w0.116: v1(197.432,42.303) 197.351,42.303 197.122,42.532 196.968,42.532 196.7,42.264 196.7,41.8 197.295,41.205 198.903,41.205 199.4,40.708 199.4,40.698 199.4,40.509 ccw(c199.658,40.509) 199.658,40.251 200.738,40.251 cw(c200.738,39.732) 201.257,39.732 cw(c200.738,39.732) 200.738,39.213 199.397,39.213 ccw(c199.397,38.955) 199.139,38.955 ccw(c199.397,38.955) 199.397,38.697 201.103,38.697 cw(c201.103,38.178) 201.622,38.178 cw(c201.103,38.178) 201.103,37.659 199.658,37.659 ccw(c199.658,37.401) 199.4,37.401 199.4,36.562 199.4,36.319 199.4,28.908 199.4,28.289 cw(c198.881,28.289) 198.881,27.77 197.919,27.77 ccw(c197.919,27.512) 197.919,27.254 199.364,27.254 cw(c199.364,26.735) 199.364,26.216 197.919,26.216 ccw(c197.919,25.958) 197.919,25.7 199.364,25.7 cw(c199.364,25.181) 199.364,24.662 197.919,24.662 ccw(c197.919,24.404) 197.919,24.146 199.364,24.146 cw(c199.364,23.627) 199.364,23.108 197.919,23.108 ccw(c197.919,22.85) 197.919,22.592 199.364,22.592 cw(c199.364,22.073) 199.364,21.554 197.919,21.554 ccw(c197.919,21.296) 197.919,21.038 199.364,21.038 cw(c199.364,20.519) 199.364,20 197.919,20 ccw(c197.919,19.742) 197.919,19.484 199.364,19.484 cw(c199.364,18.965) 199.364,18.446 197.919,18.446 ccw(c197.919,18.188) 197.919,17.93 199.364,17.93 cw(c199.364,17.411) 199.364,16.892 197.919,16.892 ccw(c197.919,16.634) 197.919,16.376 198.881,16.376 cw(c198.881,15.857) 199.4,15.857 199.4,15.669 199.4,12.9 197.5,11 197.5,7.068 197.871,6.697 197.871,6.69 198.5,6.061 199.978,6.061 200.331,5.708 200.331,5.404 200.33,5.308 200.689,4.95 T_J4.K4@200.9,4.95
  Bottom Layer w0.116: T_R38.1@195.47,42.2 195.702,42.432 195.702,42.464 195.77,42.532 197.122,42.532 197.351,42.303 v1(197.432,42.303)
BP_IO.LVDS_P4: T_J4.H4 T_R39.1 | length 85.7
  TopLayer w0.116: v1@197.695,40.315 197.605,40.315 197.39,40.1 197.011,40.1 196.539,39.628 196.539,38.408 196.539,38.22 ccw(c197.058,38.22) 197.058,37.701 198.133,37.701 cw(c198.133,37.443) 198.133,37.185 196.26,37.185 ccw(c196.26,36.666) 196.26,36.147 198.133,36.147 cw(c198.133,35.889) 198.133,35.631 196.26,35.631 ccw(c196.26,35.112) 196.26,34.593 198.133,34.593 cw(c198.133,34.335) 198.133,34.077 196.26,34.077 ccw(c196.26,33.558) 196.26,33.039 198.133,33.039 cw(c198.133,32.781) 198.133,32.523 196.26,32.523 ccw(c196.26,32.004) 196.26,31.485 198.133,31.485 cw(c198.133,31.227) 198.133,30.969 196.26,30.969 ccw(c196.26,30.45) 196.26,29.931 198.133,29.931 cw(c198.133,29.673) 198.133,29.415 196.26,29.415 ccw(c196.26,28.896) 196.26,28.377 196.281,28.377 cw(c196.281,28.119) 196.539,28.119 196.539,27.502 196.539,17.13 196.539,16.061 196.139,15.661 196.139,15.387 ccw(c196.658,15.387) 196.658,14.868 198.097,14.868 cw(c198.097,14.61) 198.097,14.352 195.941,14.352 ccw(c195.941,13.833) 195.941,13.314 197.892,13.314 cw(c197.892,13.056) 197.892,12.798 196.658,12.798 ccw(c196.658,12.279) 196.139,12.279 196.139,11.386 196.139,10.002 196.139,9.184 cw(c195.881,9.184) 195.881,8.926 195.625,8.926 ccw(c195.625,8.407) 195.625,7.888 195.881,7.888 cw(c195.881,7.63) 196.139,7.63 196.139,7.442 196.139,6.892 197.188,5.843 197.188,5.259 197.188,5.043 198.492,3.739 204.078,3.739 204.531,4.192 204.531,4.496 204.53,4.592 204.889,4.95 T_J4.H4@205.1,4.95
  Bottom Layer w0.116: T_R39.1@195.47,40.4 195.47,40.38 195.77,40.08 196.165,40.08 196.175,40.09 197.39,40.09 197.62,40.32 v1(197.7,40.32)
BP_IO.LVDS_P5: T_J4.J5 T_R40.1 | length 83
  TopLayer w0.116: v1(200.959,36.3) 200.753,36.026 ccw(c200.846,35.956) 200.73,35.956 200.729,35.001 200.729,34.813 ccw(c200.987,34.813) 200.987,34.555 201.708,34.555 cw(c201.708,34.036) 201.708,33.517 200.409,33.517 ccw(c200.409,33.259) 200.409,33.001 201.708,33.001 cw(c201.708,32.482) 201.708,31.963 200.409,31.963 ccw(c200.409,31.705) 200.409,31.447 201.708,31.447 cw(c201.708,30.928) 201.708,30.409 200.409,30.409 ccw(c200.409,30.151) 200.409,29.893 201.708,29.893 cw(c201.708,29.374) 201.708,28.855 200.409,28.855 ccw(c200.409,28.597) 200.409,28.339 201.708,28.339 cw(c201.708,27.82) 201.708,27.301 200.638,27.301 ccw(c200.638,27.043) 200.638,26.785 201.708,26.785 cw(c201.708,26.266) 201.708,25.747 200.638,25.747 ccw(c200.638,25.489) 200.638,25.231 201.708,25.231 cw(c201.708,24.712) 201.708,24.193 200.638,24.193 ccw(c200.638,23.935) 200.638,23.677 201.708,23.677 cw(c201.708,23.158) 201.708,22.639 200.638,22.639 ccw(c200.638,22.381) 200.638,22.123 201.708,22.123 cw(c201.708,21.604) 201.708,21.085 200.638,21.085 ccw(c200.638,20.827) 200.638,20.569 201.708,20.569 cw(c201.708,20.05) 201.708,19.531 200.638,19.531 ccw(c200.638,19.273) 200.638,19.015 201.708,19.015 cw(c201.708,18.496) 201.708,17.977 200.638,17.977 ccw(c200.638,17.719) 200.638,17.461 201.708,17.461 cw(c201.708,16.942) 201.708,16.423 200.409,16.423 ccw(c200.409,16.165) 200.409,15.907 201.708,15.907 cw(c201.708,15.388) 201.708,14.869 200.45,14.869 ccw(c200.45,14.611) 200.45,14.353 200.988,14.353 cw(c200.988,13.834) 200.988,13.315 ccw(c200.987,13.057) 200.729,13.057 200.729,12.729 200.481,12.481 200.423,12.423 198.455,10.455 198.455,8.545 198.919,8.081 201.258,8.081 201.631,7.708 201.631,7.404 201.63,7.308 201.989,6.95 T_J4.J5@202.2,6.95
  Bottom Layer w0.116: T_R40.1@195.47,34.6 195.47,34.62 195.702,34.852 195.721,34.852 195.77,34.901 200.371,34.901 200.761,35.292 200.761,35.828 200.73,35.859 200.73,35.99 200.959,36.22 v1(200.959,36.3)
BP_IO.LVDS_P6: T_J4.G5 T_R41.1 | length 82
  TopLayer w0.116: T_J4.G5@206.403,6.95 206.192,6.95 205.834,7.308 205.834,7.404 205.834,7.632 205.902,7.7 215.5,7.7 216.157,8.357 216.157,30.912 214.614,32.456 213.81,32.456 213.58,32.685 v1(213.5,32.685)
  Bottom Layer w0.116: T_R41.1@195.47,32.9 195.685,32.685 195.685,32.523 195.753,32.455 196.271,32.455 198.849,32.456 199.037,32.456 ccw(c199.037,32.713) 199.295,32.713 199.295,33.375 cw(c199.814,33.375) 200.333,33.375 200.333,31.713 ccw(c200.591,31.713) 200.849,31.713 200.849,33.375 cw(c201.368,33.375) 201.887,33.375 201.887,31.713 ccw(c202.145,31.713) 202.403,31.713 202.403,33.375 cw(c202.922,33.375) 203.441,33.375 203.441,31.713 ccw(c203.699,31.713) 203.957,31.713 203.957,33.375 cw(c204.476,33.375) 204.995,33.375 204.995,31.713 ccw(c205.253,31.713) 205.511,31.713 205.511,33.375 cw(c206.03,33.375) 206.549,33.375 206.549,31.713 ccw(c206.807,31.713) 207.065,31.713 207.065,33.375 cw(c207.584,33.375) 208.103,33.375 208.103,31.803 ccw(c208.361,31.803) 208.619,31.803 208.619,32.714 cw(c209.138,32.714) 209.657,32.714 ccw(c209.915,32.713) 209.915,32.456 211.71,32.456 213.19,32.456 213.42,32.685 v1(213.5,32.685)
BP_IO.LVDS_P7: T_J4.E6 T_R42.1 | length 82.9
  TopLayer w0.116: v1(208.309,28.809) 208.366,28.752 208.366,28.428 208.731,28.063 208.731,25.9 208.731,25.792 208.73,25.711 ccw(c208.988,25.711) 208.988,25.453 211.091,25.453 cw(c211.091,24.934) 211.091,24.415 207.913,24.415 ccw(c207.913,24.157) 207.913,23.899 211.091,23.899 cw(c211.091,23.38) 211.091,22.862 207.913,22.862 ccw(c207.913,22.604) 207.913,22.346 211.091,22.346 cw(c211.091,21.827) 211.091,21.308 207.913,21.308 ccw(c207.913,21.05) 207.913,20.792 211.091,20.792 cw(c211.091,20.273) 211.091,19.754 207.913,19.754 ccw(c207.913,19.496) 207.913,19.238 211.091,19.238 cw(c211.091,18.719) 211.091,18.2 207.913,18.2 ccw(c207.913,17.942) 207.913,17.684 211.091,17.684 cw(c211.091,17.165) 211.091,16.646 207.913,16.646 ccw(c207.913,16.388) 207.913,16.13 210.824,16.13 cw(c210.824,15.611) 210.824,15.092 208.211,15.092 ccw(c208.211,14.834) 208.211,14.576 cw(c208.212,14.057) 208.73,14.057 208.73,13.215 208.731,9.5 208.73,9.448 209.229,8.95 T_J4.E6@209.3,8.95
  Bottom Layer w0.116: T_R42.1@195.47,30.116 195.47,30.096 195.702,29.864 195.722,29.864 195.835,29.751 207.043,29.751 207.928,28.866 208.252,28.866 v1(208.309,28.809)
BP_IO.LVDS_P8: T_J4.B6 T_R43.1 | length 83.3
  TopLayer w0.116: v1(200.547,60.347) 200.604,60.29 200.604,59.965 200.834,59.735 201.561,59.008 201.561,43.539 203.439,41.661 206.839,41.661 209.2,39.3 209.2,32.569 212.934,28.835 212.934,9.519 T_J4.B6@213.503,8.95
  Bottom Layer w0.116: T_R43.1@180.47,55.476 180.702,55.244 180.702,55.174 180.77,55.106 181.337,55.106 181.715,55.485 181.715,58.415 184.061,60.761 199.808,60.761 200.165,60.404 200.49,60.404 v1(200.547,60.347)
BP_IO.LVDS_P9: T_J4.K6 T_R44.1 | length 82.7
  TopLayer w0.116: v1(186.5,48.5) 186.5,48.631 186.732,48.863 186.732,49.157 ccw(c186.616,49.157) 186.73,49.177 cw(c187.456,49.313) 186.73,49.449 ccw(c186.616,49.469) 186.732,49.469 186.732,54.001 188.073,55.343 192.706,55.343 194.839,57.475 197.788,57.475 198.261,57.002 198.261,52.4 198.261,51.434 cw(c197.742,51.434) 197.742,50.915 197.277,50.915 ccw(c197.277,50.657) 197.277,50.399 198.242,50.399 cw(c198.242,49.88) 198.242,49.362 197.277,49.362 ccw(c197.277,49.104) 197.277,48.846 197.742,48.846 cw(c197.742,48.327) 198.261,48.327 198.261,47.365 198.261,43.874 203.4,38.735 203.4,13.3 200.331,10.231 200.331,9.404 200.33,9.308 200.689,8.95 T_J4.K6@200.9,8.95
  Bottom Layer w0.116: T_R44.1@180.47,49.7 180.47,49.72 180.812,50.062 181.138,50.062 181.961,49.239 186.588,49.239 186.706,49.121 186.706,48.81 186.5,48.604 v1(186.5,48.5)
BP_IO.LVDS_P10: T_J4.H6 T_R45.1 | length 83.8
  TopLayer w0.116: v1(185.38,46.2) 185.38,46.28 185.61,46.51 185.61,56.079 188.592,59.061 198.608,59.061 199.8,57.869 199.8,43.869 204.531,39.139 204.531,9.404 204.53,9.308 204.889,8.95 T_J4.H6@205.1,8.95
  Bottom Layer w0.116: T_R45.1@180.47,47.976 180.47,47.956 180.702,47.724 180.722,47.724 180.861,47.585 181.54,47.585 183.455,45.67 185.542,45.67 185.61,45.738 185.61,45.89 185.38,46.12 v1(185.38,46.2)
BP_IO.LVDS_P11: T_J5.D1 T_R46.1 | length 83.7
  TopLayer w0.116: v1@183.763,43.065 183.82,43.122 183.82,43.439 184.077,43.697 184.077,44.8 184.077,44.989 ccw(c183.558,44.989) 183.558,45.508 183.335,45.508 cw(c183.335,45.766) 183.335,46.024 183.678,46.024 ccw(c183.678,46.543) 183.678,47.062 183.335,47.062 cw(c183.335,47.319) 183.335,47.577 183.678,47.577 ccw(c183.678,48.096) 183.678,48.615 183.335,48.615 cw(c183.335,48.873) 183.335,49.131 183.678,49.131 ccw(c183.678,49.65) 183.678,50.169 183.335,50.169 cw(c183.335,50.427) 183.335,50.685 183.678,50.685 ccw(c183.678,51.204) 183.678,51.723 183.335,51.723 cw(c183.335,51.981) 183.335,52.239 183.678,52.239 ccw(c183.678,52.758) 183.678,53.277 183.335,53.277 cw(c183.335,53.535) 183.335,53.793 183.678,53.793 ccw(c183.678,54.312) 183.678,54.831 183.335,54.831 cw(c183.335,55.089) 183.335,55.347 183.678,55.347 ccw(c183.678,55.866) 183.678,56.385 183.335,56.385 cw(c183.335,56.643) 183.335,56.901 183.678,56.901 ccw(c183.678,57.42) 183.678,57.939 183.469,57.939 cw(c183.469,58.197) 183.469,58.455 183.678,58.455 ccw(c183.678,58.974) 183.678,59.493 183.558,59.493 cw(c183.558,59.751) 183.558,60.009 ccw(c183.558,60.528) 184.077,60.528 184.077,61.226 184.077,63.041 184.213,63.177 184.347,63.31 ccw(c183.98,63.677) 184.347,64.044 184.188,64.202 cw(c184.371,64.384) 184.189,64.567 cw(c184.371,64.384) 184.554,64.566 185.418,63.702 ccw(c185.786,64.069) 186.152,63.702 ccw(c185.786,64.069) 186.191,64.393 186.191,64.397 185.716,64.872 cw(c185.899,65.054) 185.717,65.236 cw(c185.899,65.054) 186.082,65.236 186.378,64.94 ccw(c186.746,65.306) 187.113,64.939 ccw(c186.746,65.306) 187.151,65.63 187.151,65.635 186.815,65.971 cw(c186.998,66.153) 186.815,66.335 cw(c186.998,66.153) 187.181,66.335 ; 187.181,66.335 187.386,66.13 ccw(c187.753,66.496) 188.12,66.129 ccw(c187.753,66.496) 188.159,66.82 188.159,66.825 187.914,67.07 cw(c188.097,67.252) 187.914,67.434 cw(c188.097,67.252) 188.28,67.434 188.486,67.228 ; 188.486,67.227 ccw(c188.853,67.594) 189.22,67.227 ccw(c188.853,67.594) 189.259,67.918 189.259,67.923 189.012,68.169 cw(c189.196,68.35) 189.013,68.533 cw(c189.196,68.35) 189.378,68.532 189.587,68.324 ; 189.587,68.323 ccw(c189.955,68.69) 190.322,68.323 ccw(c189.955,68.69) 190.36,69.014 190.36,69.019 190.111,69.268 cw(c190.294,69.449) 190.112,69.632 cw(c190.294,69.449) 190.477,69.631 190.689,69.419 ccw(c191.057,69.786) 191.424,69.419 ccw(c191.057,69.786) 191.462,70.11 191.462,70.115 190.881,70.695 cw(c191.065,70.877) 190.882,71.059 cw(c191.065,70.877) 191.247,71.059 ; 191.248,71.059 191.304,71.002 ccw(c191.671,71.369) 192.038,71.002 192.726,71.689 193.737,72.7 209.469,72.7 210.061,73.292 210.061,75.342 210.034,75.369 210.034,75.465 210.518,75.95 T_J5.D1@210.603,75.95
  Bottom Layer w0.116: T_R46.1@180.57,42.2 180.802,42.432 180.802,42.477 180.87,42.544 182.9,42.544 183.368,43.013 183.693,43.013 183.706,43.001 v1(183.763,43.057)
BP_IO.LVDS_P12: T_J5.A1 T_R47.1 | length 82.8
  TopLayer w0.116: v1(186.7,39.5) 186.643,39.557 186.319,39.557 184.739,41.136 184.739,46.839 184.993,47.093 184.993,61.556 187.071,63.634 188.301,64.865 cw(c188.484,64.682) 188.666,64.865 ccw(c189.033,65.232) 189.4,64.865 ccw(c189.033,65.232) 189.4,65.599 189.014,65.985 cw(c189.196,66.167) 189.014,66.35 cw(c189.196,66.167) 189.378,66.351 190.406,65.323 ; 190.406,65.323 ccw(c190.773,65.689) 191.14,65.322 ccw(c190.774,65.689) 191.179,66.013 191.179,66.018 190.104,67.093 cw(c190.287,67.274) 190.105,67.457 cw(c190.287,67.274) 190.47,67.456 ; 190.47,67.456 191.505,66.422 ccw(c191.872,66.788) 192.239,66.421 ccw(c191.872,66.788) 192.278,67.112 192.278,67.117 191.206,68.188 cw(c191.389,68.37) 191.207,68.553 cw(c191.389,68.37) 191.572,68.552 192.603,67.52 ccw(c192.971,67.887) 193.338,67.52 ccw(c192.971,67.887) 193.376,68.211 193.376,68.215 192.296,69.296 cw(c192.48,69.477) 192.297,69.66 cw(c192.48,69.477) 192.662,69.659 193.702,68.619 ; 193.703,68.619 ccw(c194.07,68.986) 194.437,68.619 ccw(c194.07,68.986) 194.475,69.31 194.475,69.314 193.795,69.994 cw(c193.978,70.176) 193.796,70.359 193.929,70.492 195.037,71.6 212.5,71.6 214.234,73.334 214.234,75.38 T_J5.A1@214.803,75.95
  Bottom Layer w0.116: T_R47.1@180.47,40.176 180.702,39.944 180.702,39.874 180.77,39.806 186.069,39.806 186.319,39.557 186.643,39.557 v1(186.7,39.5)
BP_IO.LVDS_P13: T_J5.J1 T_R48.1 | length 82.9
  TopLayer w0.116: 181.526,69.273 182.734,68.065 ccw(c183.102,68.431) 183.469,68.065 ccw(c183.102,68.431) 183.507,68.756 183.507,68.76 182.259,70.009 cw(c182.442,70.19) 182.259,70.373 cw(c182.442,70.19) 182.625,70.372 183.833,69.164 ; 181.526,69.274 ccw(c181.343,69.092) 181.16,69.274 ccw(c181.343,69.092) 181.16,68.91 181.918,68.152 cw(c181.551,67.785) 181.918,67.418 181.785,67.285 181.394,66.894 181.394,41.106 183.061,39.439 183.061,35.161 182.455,34.555 182.01,34.555 181.755,34.3 v1(181.7,34.3) ; 183.833,69.164 ccw(c184.201,69.53) 184.568,69.163 ccw(c184.201,69.53) 184.606,69.855 184.606,69.859 183.357,71.108 cw(c183.541,71.289) 183.358,71.472 cw(c183.541,71.289) 183.723,71.471 184.932,70.263 ccw(c185.3,70.629) 185.667,70.262 ccw(c185.3,70.629) 185.705,70.953 185.705,70.958 184.456,72.206 cw(c184.639,72.388) 184.457,72.571 cw(c184.639,72.388) 184.822,72.57 186.031,71.362 ccw(c186.398,71.728) 186.765,71.361 ccw(c186.398,71.728) 186.804,72.052 186.804,72.057 185.555,73.305 cw(c185.738,73.487) 185.556,73.669 cw(c185.738,73.487) 185.921,73.669 187.085,72.505 ccw(c187.452,72.872) 187.819,72.505 ccw(c187.452,72.872) 187.819,73.239 187.412,73.646 cw(c187.594,73.828) 187.412,74.011 cw(c187.594,73.828) 187.776,74.012 ccw(c188.144,74.378) 188.511,74.011 189.039,74.539 189.102,74.539 201.181,74.539 201.634,74.992 201.634,75.496 201.634,75.592 201.992,75.95 T_J5.J1@202.203,75.95
  Bottom Layer w0.116: T_R48.1@180.47,34.176 180.702,34.408 180.702,34.478 180.77,34.545 181.39,34.545 181.636,34.3 v1(181.7,34.3)
BP_IO.LVDS_P14: T_J5.G1 T_R49.1 | length 86.4
  TopLayer w0.116: v1(184,32.511) 183.92,32.511 183.69,32.282 183.39,32.282 183.257,32.415 183.257,33.061 184.461,34.265 184.461,34.461 184.461,34.835 cw(c184.619,34.835) 184.619,34.993 184.659,34.993 ccw(c184.659,35.151) 184.817,35.151 ccw(c184.659,35.151) 184.659,35.309 184.619,35.309 cw(c184.619,35.467) 184.461,35.467 cw(c184.619,35.467) 184.619,35.625 184.659,35.625 ccw(c184.659,35.783) 184.817,35.783 ccw(c184.659,35.783) 184.659,35.941 184.619,35.941 cw(c184.619,36.099) 184.461,36.099 184.461,36.485 184.461,40.239 182.461,42.239 182.461,63.692 182.623,63.854 184.035,65.266 ccw(c183.668,65.633) 184.035,66 183.627,66.409 cw(c183.809,66.591) 183.627,66.774 cw(c183.809,66.591) 183.991,66.774 184.793,65.973 ccw(c185.16,66.339) 185.527,65.972 ccw(c185.16,66.339) 185.566,66.663 185.566,66.668 184.662,67.571 cw(c184.845,67.753) 184.663,67.936 cw(c184.845,67.753) 185.028,67.935 ; 185.028,67.935 185.892,67.071 ; 185.892,67.071 ccw(c186.259,67.438) 186.626,67.071 ccw(c186.259,67.438) 186.664,67.762 186.664,67.766 185.761,68.67 cw(c185.944,68.852) 185.761,69.034 cw(c185.944,68.852) 186.127,69.034 ; 186.127,69.034 186.99,68.17 ; 186.991,68.17 ccw(c187.358,68.537) 187.725,68.17 ccw(c187.358,68.537) 187.763,68.861 187.763,68.865 186.859,69.769 cw(c187.043,69.951) 186.86,70.133 cw(c187.043,69.951) 187.226,70.133 188.089,69.269 ccw(c188.457,69.635) 188.824,69.268 ccw(c188.457,69.635) 188.862,69.96 188.862,69.964 187.958,70.868 cw(c188.141,71.05) 187.959,71.232 cw(c188.141,71.05) 188.324,71.232 189.188,70.368 ccw(c189.556,70.734) 189.923,70.367 ccw(c189.556,70.734) 189.961,71.058 189.961,71.063 189.057,71.967 cw(c189.24,72.148) 189.058,72.331 cw(c189.24,72.148) 189.423,72.33 189.894,71.86 ccw(c190.261,72.226) 190.628,71.859 191.311,72.542 192.408,73.639 204.908,73.639 205.834,74.565 205.834,75.38 T_J5.G1@206.403,75.95
  Bottom Layer w0.116: T_R49.1@180.47,32.676 180.702,32.444 180.702,32.349 180.77,32.281 181.271,32.281 183.69,32.282 183.92,32.511 v1(184,32.511)